# EAGLE board FDC_Board (2) (EAGLE 8.2.2)
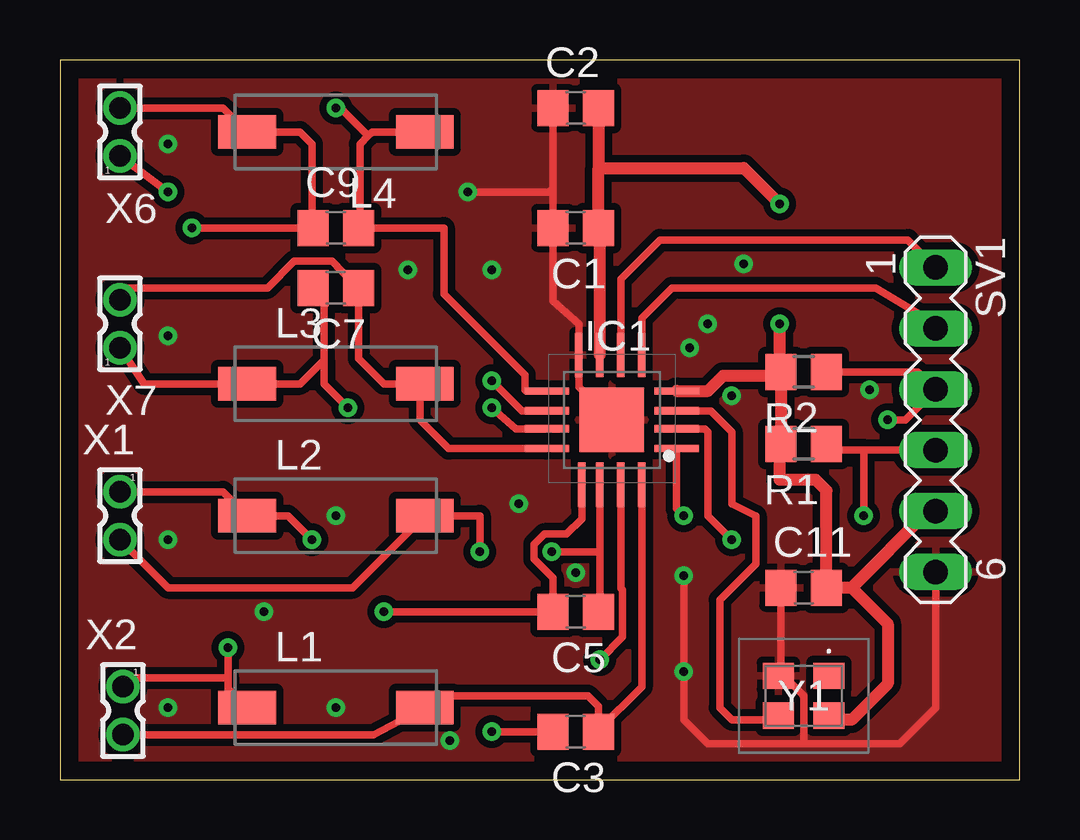
[diagram p0: board, top side]
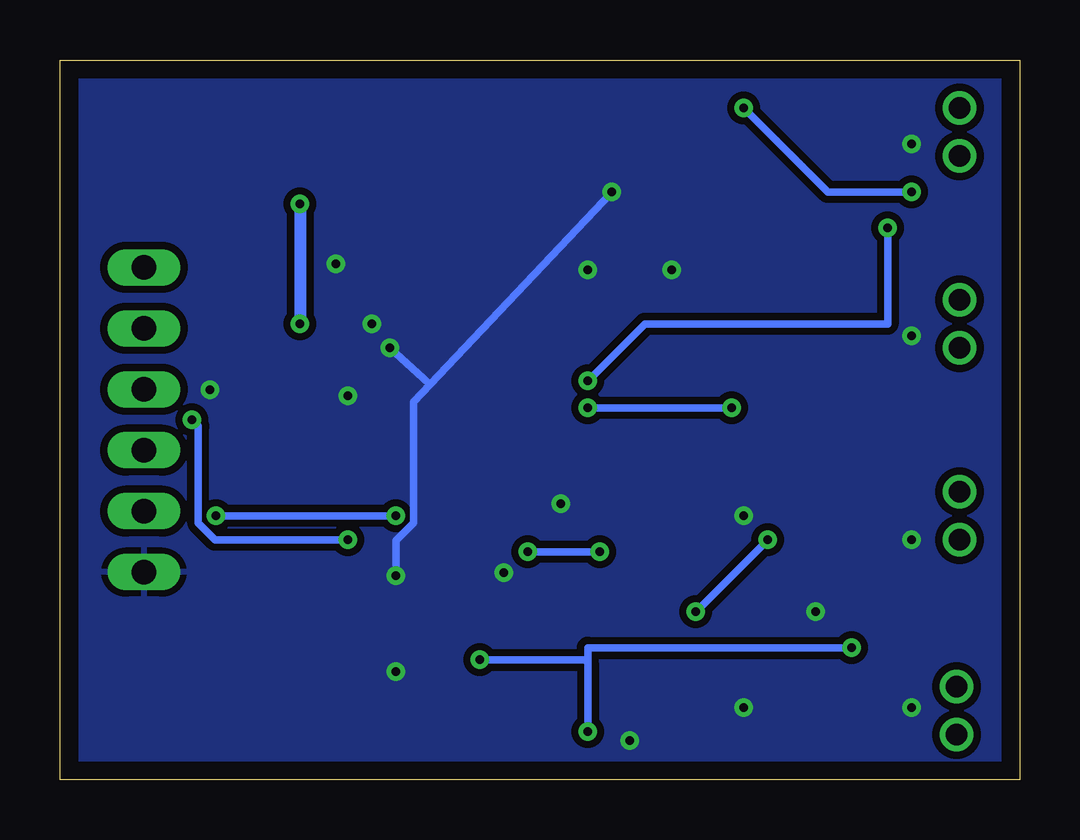
[diagram p1: board, bottom side, seen from below]

Size 40 x 30 mm. Coordinates in mm from the lower left corner, seen from the top.
Outline: 0,0 40,0 40,30 0,30 0,0
Copper layers (1*16): Top 0.035mm / dielectric 1.5mm / Bottom 0.035mm
Design rules "default *": minimum track width 3mil, minimum drill 0.35mm, track to track 6mil, track to pad 8mil, pad to pad 8mil, via to via 8mil, smd to smd 8mil, copper to edge 30mil, drill to drill 6mil, minimum pad ring 10mil, minimum via ring 8mil, stop-mask expansion 4mil, vias tented up to drill 0mil, thermal gap 10mil

## Footprints (pad centres in the part's own frame; a part is rotated, then mirrored left to right if it is on the bottom)
C0805 = smd 1.3 x 1.5: 1 -0.95,0; 2 0.95,0
QFN50P400X400X80-17N = smd 1.85 x 0.3: 1 -2.7,1.2; 2 -2.7,0.375; 3 -2.7,-0.375; 4 -2.7,-1.2; 9 2.7,-1.2; 10 2.7,-0.375; 11 2.7,0.375; 12 2.7,1.2 | smd 0.3 x 1.85: 5 -1.25,-2.7; 6 -0.375,-2.7; 7 0.5,-2.7; 8 1.375,-2.7; 13 1.25,2.7; 14 0.5,2.7; 15 -0.375,2.7; 16 -1.25,2.7 | smd 2.7 x 2.7: 17 0,0
L8530M = smd 2.4 x 1.4: 1 -3.7,0; 2 3.7,0
R0805 = smd 1.3 x 1.5: 1 -0.95,0; 2 0.95,0
MA06-1 = drill 1.016 long: 1 -6.35,0; 2 -3.81,0; 3 -1.27,0; 4 1.27,0; 5 3.81,0; 6 6.35,0
332-02 = drill 0.9 pad 1.27: 1 0,-1; 2 0,1
ASE40000MHZET = smd 1.3 x 1.1: 1 -1.05,-0.825; 2 1.05,-0.825; 3 1.05,0.825; 4 -1.05,0.825

## Placement (x,y rotation side)
C1  [C0805]  21.5,23 180 top
C2  [C0805]  21.5,28 0 top
C3  [C0805]  21.5,2 180 top
C5  [C0805]  21.5,7 180 top
C7  [C0805]  11.5,20.5 180 top
C9  [C0805]  11.5,23 0 top
C11  [C0805]  31,8 0 top
IC1  FDC2214RGHR  [QFN50P400X400X80-17N]  23,15 180 top
L1  [L8530M]  11.5,3 0 top
L2  [L8530M]  11.5,11 0 top
L3  [L8530M]  11.5,16.5 0 top
L4  [L8530M]  11.5,27 180 top
R1  [R0805]  31,14 180 top
R2  [R0805]  31,17 180 top
SV1  [MA06-1]  36.5,15 270 top
X1  332-02  [332-02]  2.5,11 180 top
X2  332-02  [332-02]  2.62,2.88 180 top
X6  332-02  [332-02]  2.5,27 0 top
X7  332-02  [332-02]  2.5,19 0 top
Y1  ASE-40.000MHZ-E-T  [ASE40000MHZET]  31,3.5 180 top

## Library data of the parts
C1-C3 C5 C7 C9 C11 L1-L4 R1 R2 = rcl
IC1 = SamacSys_Parts; ARROW_PART_NUMBER: FDC2214RGHR; ARROW_PRICE-STOCK: null?utm_currency=USD&region=nac; DESCRIPTION: Proximity Sensors 4-Ch, 28-bit, capacitance to digital converter 16-WQFN -40 to 125; HEIGHT: 0.8mm; MANUFACTURER_NAME: Texas Instruments; MANUFACTURER_PART_NUMBER: FDC2214RGHR; MOUSER_PART_NUMBER: 595-FDC2214RGHR; MOUSER_PRICE-STOCK: https://www.mouser.co.uk/ProductDetail/Texas-Instruments/FDC2214RGHR?qs=GJ%2F2ZGcr5uPBUC9HQa0OnA%3D%3D
SV1 = con-lstb; OC_FARNELL: unknown; OC_NEWARK: unknown
X1 X2 X6 X7 = con-garry
Y1 = ASE-40.000MHz-E-T; DESCRIPTION: Standard Clock Oscillators XTAL OSC XO 40.0000MHZ CMOS SMD; HEIGHT: 1.2mm; MANUFACTURER_NAME: ABRACON; MANUFACTURER_PART_NUMBER: ASE-40.000MHz-E-T; MOUSER_PART_NUMBER: 815-ASE-40.0M-E-T; MOUSER_PRICE-STOCK: https://www.mouser.co.uk/ProductDetail/ABRACON/ASE-40000MHz-E-T?qs=s46Hw6dZPL6mQ8%2FGISl7aQ%3D%3D

## Nets
GND: C1.2 C2.1 C11.1 IC1.8 IC1.17 SV1.6 Y1.2
N$1: C3.2 IC1.15 L1.1 X2.1
N$3: IC1.1 R1.1 SV1.4
N$4: IC1.6 SV1.1
N$5: IC1.5 SV1.2
N$6: C5.2 IC1.13 L2.1 X1.1
N$7: C7.1 IC1.12 L3.2 X7.2
N$8: C5.1 IC1.14 L2.2 X1.2
N$10: IC1.3 Y1.3
N$11: IC1.2 R2.1 SV1.3
N$12: C7.2 IC1.11 L3.1 X7.1
N$13: C3.1 IC1.16 L1.2 X2.2
N$14: C9.2 IC1.9 L4.1 X6.1
N$15: C9.1 IC1.10 L4.2 X6.2
VCC: C1.1 C2.2 C11.2 IC1.4 IC1.7 R1.2 R2.2 SV1.5 Y1.4

## Tracks (layer width: path | path; a pad name or v marks a point on that pad's centre or on a via)
GND  (via drill 0.35)
  Top 0.305: C11.1 30.05,4.42 Y1.2 30.17,4.33 31,3.5 31,1.59 | 31,1.59 31,1.5 27,1.5 26,2.5 v26,4.5 v26,8.5 | SV1.6 36.5,3 35,1.5 31.09,1.5 31,1.59 | 20.55,24.66 20.55,23.09 | 20.55,24.66 C2.1 | 20.55,23.09 C1.2 20.55,19.95 21.62,19 IC1.8 21.62,16.38 IC1.17 | 20.46,23 20.55,23.09 | v17,24.5 20.39,24.5 20.55,24.66
  Bottom 0.305: v26,8.5 26,9.96 25.27,10.7 25.27,15.73 24.58,16.46 | v17,24.5 24.58,16.46 | 24.58,16.46 24.83,16.71 v26.25,18
  other vias: 4.5,3 11.5,3 11.5,11 4.5,18.5 4.5,10 4.5,26.5 8.5,7 28.5,21.5 14.5,21.25 19.12,11.5 28,16 27,19 18,21.25 33.75,16.25 16.25,1.62 21.5,8.62
  pour Bottom (isolate 0.305): 0,30 0,0 40,0 40,30
  pour Top (isolate 0.305): 0,0 0,30 40,30 40,0
N$1  (via drill 0.35)
  Top 0.305: C3.2 v18,2 | IC1.15 23.38,7.98 23.46,7.9 23.46,5.96 v22.5,5 | 7,4.26 v7,5.5 | 7,4.26 7,3.75 7.05,3.75 L1.1 | X2.1 3,4.25 6.99,4.25 7,4.26
  Bottom 0.305: 18,4.88 v18,2 | 18,4.88 18,5.5 v7,5.5 | v22.5,5 18.12,5 18,4.88
N$3  (via drill 0.35)
  Top 0.305: 33.59,13.73 32.22,13.73 R1.1 | 33.59,13.73 SV1.4 | IC1.1 25.7,11.3 v26,11 | v33.5,11 33.5,13.63 33.59,13.73
  Bottom 0.305: v26,11 v33.5,11
N$4
  Top 0.305: IC1.6 23.38,20.88 25,22.5 35.35,22.5 SV1.1
N$5
  Top 0.305: IC1.5 24.25,19.25 25.5,20.5 34,20.5 36.5,19 SV1.2
N$6  (via drill 0.35)
  Top 0.305: X1.1 6.8,12 L2.1 9.5,11 v10.5,10 | v13.5,7 C5.2 20.55,8.41 19.77,9.2 19.77,9.8 20.2,10.23 21.11,10.23 21.75,10.88 IC1.13
  Bottom 0.305: v10.5,10 v13.5,7
N$7
  Top 0.305: X7.2 2.5,20.5 8.65,20.5 9.75,21.61 11.35,21.61 11.56,21.4 11.56,21.39 C7.1 12.45,17.55 13.5,16.5 15.03,16.5 | 15.03,16.5 L3.2 | IC1.12 16.2,13.8 15,15 15,16.47 15.03,16.5
N$8  (via drill 0.35)
  Top 0.305: X1.2 4.5,8 12.2,8 L2.2 17.5,11 v17.5,9.5 | C5.1 22.5,7.05 22.5,9.5 | 22.5,9.5 IC1.14 | v20.5,9.5 22.5,9.5
  Bottom 0.305: v17.5,9.5 v20.5,9.5
N$10
  Top 0.305: IC1.3 27.12,15.38 28,14.5 28,11.5 29,11 29,9 27.5,7.5 27.5,3 28,2.5 29.77,2.5 Y1.3
N$11  (via drill 0.35)
  Top 0.305: R2.1 35.77,17 SV1.3 35.23,15 v34.5,15 | IC1.2 26.88,14.62 27,14.5 27,11 v28,10
  Bottom 0.305: v34.5,15 34.23,14.73 34.23,10.7 33.54,10 v28,10
N$12  (via drill 0.35)
  Top 0.305: X7.1 3.5,16.5 L3.1 10,16.5 11,17.5 | 11,17.5 11,20.05 C7.2 | 11,17.5 11,16.5 v12,15.5 | v18,15.5 19,14.62 IC1.11
  Bottom 0.305: v12,15.5 v18,15.5
N$13
  Top 0.305: 2.5,2 X2.2 13.08,1.88 L1.2 15.7,3.5 22,3.5 22.45,3.05 22.45,2.06 | 22.45,2.06 C3.1 | IC1.16 24.25,3.86 22.45,2.06
N$14  (via drill 0.35)
  Top 0.305: L4.1 13,27 12.85,26.85 | 12.85,26.85 12.5,26.5 12.5,23.05 C9.2 16,23 16,20.25 19.38,16.88 19.38,16.25 19.42,16.2 IC1.9 | X6.1 v4.5,24.5 | v11.5,28 11.7,28 12.85,26.85
  Bottom 0.305: v4.5,24.5 8,24.5 v11.5,28
N$15  (via drill 0.35)
  Top 0.305: X6.2 6.8,28 L4.2 10,27 10.5,26.5 10.5,23.05 | 10.5,23.05 C9.1 | v5.5,23 10.45,23 10.5,23.05 | IC1.10 19.25,15.38 v18,16.62
  Bottom 0.305: v5.5,23 5.5,19 15.62,19 v18,16.62
VCC  (via drill 0.35)
  Top 0.508: 30.05,16.98 R1.2 30,13.95 30,12.5 31.5,12.5 31.95,12.05 C11.2 32.98,8 | 30.05,16.98 R2.2 | C2.2 22.45,25.5 | 22.45,25.5 C1.1 22.5,22.95 IC1.7 | 32.98,8 33,8 34.5,6.5 34.5,4 33,2.5 32.23,2.5 Y1.4 | SV1.5 36.17,11.19 32.98,8 | 29.94,17 30.03,17 30.05,16.98 | 22.45,25.5 28.5,25.5 v30,24 | v30,19 30,17.06 29.94,17 | IC1.4 27.02,16.2 27.65,16.84 29.77,16.84 29.94,17
  Bottom 0.508: v30,24 v30,19